# Altium PCB uni project 1.PcbDoc
Units mm, origin at the board's own origin, x right, y up, seen from the top; angles counter-clockwise.
Board outline 34.42 x 13.97 mm, 2 copper layers (Top Layer, Bottom Layer), stack 1.661 mm thick; 9 components, 8 nets, 25 pads, 2 vias.
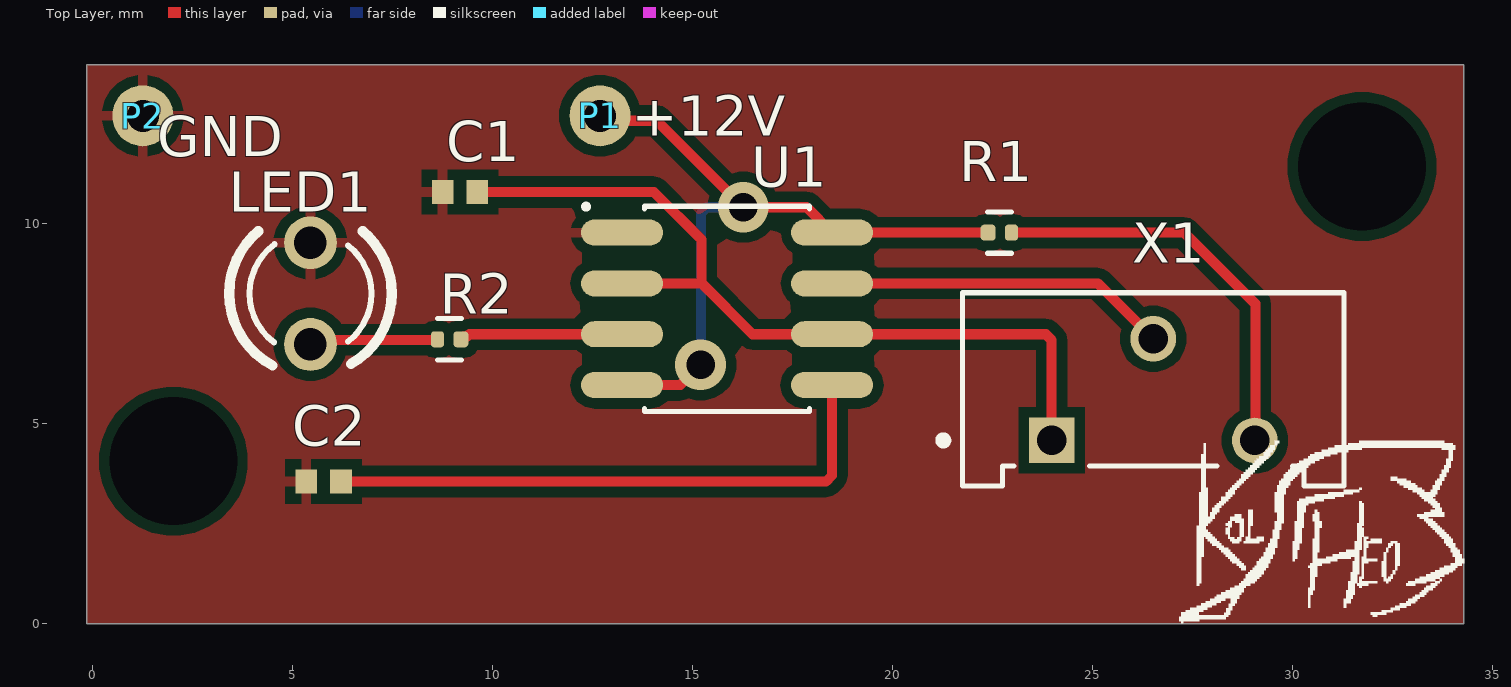
[diagram p0: Top Layer view]
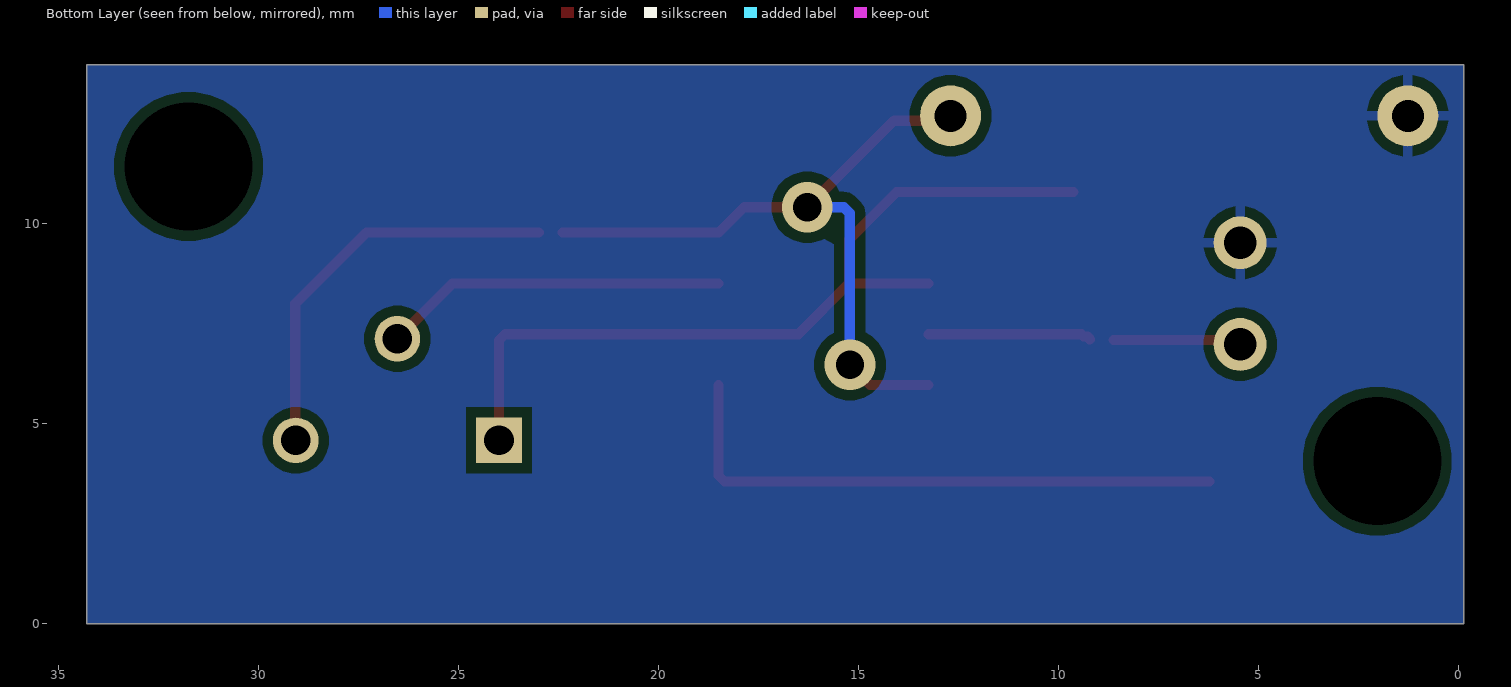
[diagram p1: Bottom Layer view, seen from below]
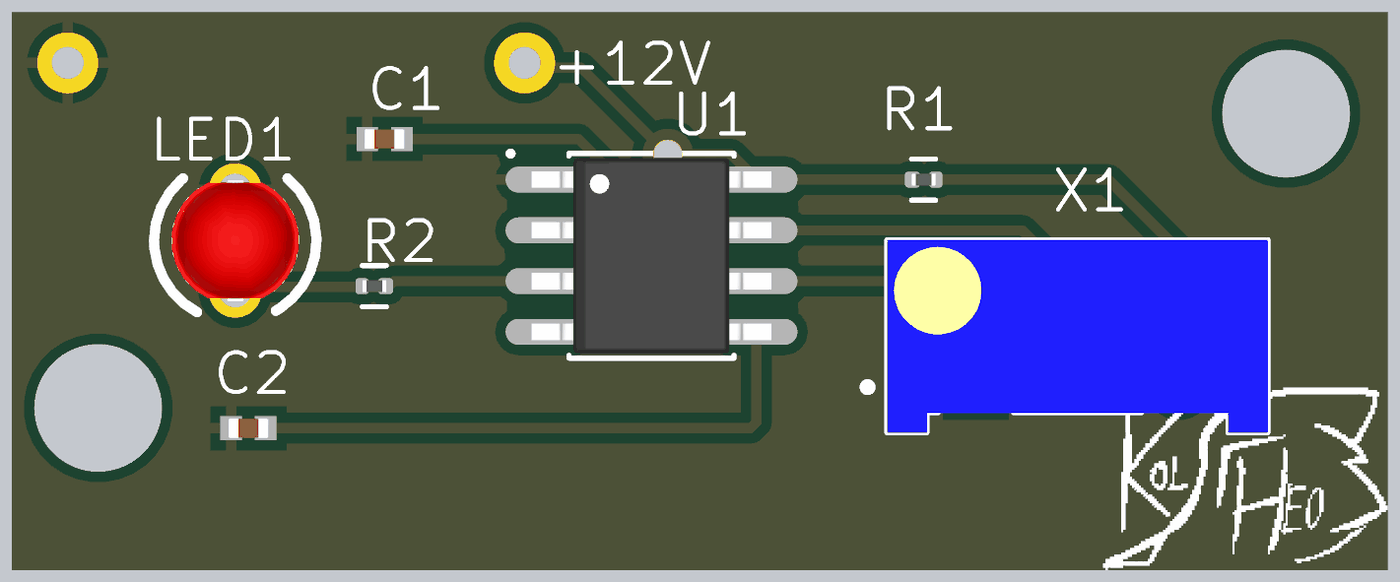
[diagram p2: 3D render of the assembled board from above, using the file's embedded part models]

## Layer stack, top to bottom
Top Solder: solder mask 0.0102, Solder Resist, Dk 3.5
Top Layer: signal copper 0.0356
Dielectric 1: dielectric 1.59, FR-4, Dk 4.8
Bottom Layer: signal copper 0.0356
Bottom Solder: solder mask 0.0102, Solder Resist, Dk 3.5

## Board outline
-0.127,0 -0.127,13.97 34.29,13.97 34.29,0

## Design rules (kind name [scope] priority, off if disabled: settings)
Clearance [All] p1: gap=0.254 ignorepadtopadclearanceinfootprint=FALSE
PolygonConnect [All] p1: connectstyle=Relief reliefconductorwidth=0.254 reliefentries=4 polygonreliefangle="90 Angle" airgapwidth=0.254
RoutingVias [All] p1: holewidth=0.711 width=1.27 viastyle="Through Hole" minholewidth=0.711 minwidth=1.27 maxholewidth=0.711 maxwidth=1.27
SolderMaskExpansion [All] p1: expansion=0 istentingtop=FALSE
SupplyNets "Schematic Supply Nets_1" [InNet('GND')] p1: voltage=0.000
SupplyNets "Schematic Supply Nets" [InNet('+12V')] p2: voltage=0.000
Width [All] p1: maxlimit=0.254 minlimit=0.254 preferedwidth=0.254
30 further rules are at their usual default settings.

## Components (designator, comment, footprint, x,y, rotation, side; value= is the part's Value field where it differs from the comment)
C1 "GJM1555C1H1R0BB01D" CAPC1005X55N 9.195,10.795 r0 top
C2 "GJM1555C1H1R0BB01D" CAPC1005X55N 5.791,3.556 r0 top
LED1 "TLLR4400" "LED3MM IR" 5.461,8.255 r90 top
P1 "+12V" Pin1 12.7,12.7 r0 top
P2 "GND" Pin1 1.27,12.7 r0 top
R1 "RC0201FR-071KL" RESC0603X26N 22.682,9.779 r180 top
R2 "RC0201FR-071KL" RESC0603X26N 8.941,7.112 r0 top
U1 "NE555DRG4" SO-8 15.875,7.874 r0 top
X1 "3296Y-1-102" TRIM_3296Y-1-102 26.53,5.855 r0 top

## Footprints (in the part's own frame and the unit in brackets; to place one, negate y for a bottom-side part, rotate by r counter-clockwise, add the part's x,y. Pads: shape width x height; smd on the part's side, far side on the other; paste and mask are expansions set on the pad)
CAPC1005X55N [mm]
  rect 0.54x0.6 smd: 1(-0.432,0) 2(0.432,0)
  body extent -0.5,-0.25 0.5,0.25, height 0.55
"LED3MM IR" [mil]
  round 52 hole 32: A(-50,0) C(50,0)
  silkscreen extent -71,-80 61,80, body extent -60,-62 60,62, height 240
Pin1 [mil]
  round 60 hole 31.5: 0(0,0)
RESC0603X26N [mm]
  rrect50% 0.33x0.4 smd: 1(-0.305,0)
  rrect50% 0.38x0.4 smd: 2(0.28,0)
  silkscreen extent -0.3,-0.52 0.3,0.52, body extent -0.3,-0.15 0.3,0.15, height 0.26
SO-8 [mm] "SOP, 8-Leads, Body 4,90x3,90mm, Pitch 1,27mm, IPC Low Density"
  oval 2.05x0.65 smd: 1(-2.625,1.905) 2(-2.625,0.635) 3(-2.625,-0.635) 4(-2.625,-1.905) 5(2.625,-1.905) 6(2.625,-0.635) 7(2.625,0.635) 8(2.625,1.905)
  silkscreen extent -3.59,-2.56 2.06,2.62, body extent -3,-2.45 3,2.45, height 1.75
TRIM_3296Y-1-102 [mm]
  rect 1.14x1.14 / inner round 1.14 / far side rect 1.14x1.14 hole 0.74: 1(-2.54,-1.27)
  round 1.14 hole 0.74: 2(0,1.27) 3(2.54,-1.27)
  silkscreen extent -5.35,-2.41 4.76,2.42, body extent -4.76,-2.41 4.76,2.41, height 11.55

## Part data
C1 C2: "0402 1 pF 50 V Â±0.1 pF Tolerance C0G SMT Multilayer Ceramic Capacitor", Package="1005 Taiyo Yuden", Check_prices=https://www.snapeda.com/parts/GJM1555C1H1R0BB01D/Murata/view-part/?ref=eda, MF=Murata, MP=GJM1555C1H1R0BB01D, SnapEDA_Link=https://www.snapeda.com/parts/GJM1555C1H1R0BB01D/Murata/view-part/?ref=snap
LED1: "Red 619nm LED Indication - Discrete 1.9V Radial", Package=None, Check_prices=https://www.snapeda.com/parts/TLLR4400/Vishay+Semiconductor+Opto+Division/view-part/?ref=eda, MF=Vishay, MP=TLLR4400, SnapEDA_Link=https://www.snapeda.com/parts/TLLR4400/Vishay+Semiconductor+Opto+Division/view-part/?ref=snap
P1 P2: library part Pin1
R1 R2: "1 kOhms Â±1% 0.05W, 1/20W Chip Resistor 0201 (0603 Metric) Moisture Resistant Thick Film", Package="0201 Yageo", Check_prices=https://www.snapeda.com/parts/RC0201FR-071KL/Yageo/view-part/?ref=eda, MF=Yageo, MP=RC0201FR-071KL, SnapEDA_Link=https://www.snapeda.com/parts/RC0201FR-071KL/Yageo/view-part/?ref=snap
U1: library part NE555, "IC OSC SGL TIMER 100KHZ 8-SOIC", Case/Package=SOIC, Frequency=100kHz, High Level Output Current=-200mA, Low Level Output Current=200mA, Max Operating Temperature=70°C, Max Supply Voltage=16V, Min Operating Temperature=0°C, Min Supply Voltage=4.5V, Nominal Supply Current=2mA, Operating Supply Current=10mA, Package Quantity=2500, Quiescent Current=15mA, Height=1.58mm, Lead Free="Lead Free", Length=4.9mm, Mount="Surface Mount", Number of Pins=8, Number of Timers/Counters=1, Packaging="Tape and Reel", Radiation Hardening=No, RoHS Compliant=Yes, Series=-, Supply Current=2mA, Weight=0.002561oz, Width=3.91mm
X1: Package=None, Availability=Unavailable, MP=3296Y-1-102, Price=None

## Free pads (board coordinates)
  round 0 hole 3.2 unplated: 1(2.032,4.064) 1(31.75,11.43)

## Via types
v1: diameter 1.27, hole 0.711, Top Layer to Bottom Layer, tented both sides, 2 vias

## Nets (pads, with @x,y where several pads share a name; then routed paths per layer and width w, separated by ;. In a path a pad name is that pad's centre, name@x,y a point inside that pad or via, vN(x,y) a via of type N, cw(c..) or ccw(c..) an arc to the next point about the centre after c; other vN are vias at no path point)
+12V: P1.0 R1.2 U1.4 U1.8 | length 18
  Top Layer w0.254: P1.0 12.823,12.577 14.118,12.577 v1(16.281,10.414) 17.865,10.414 U1.8 R1.2 ; U1.4 14.707,5.969 v1(15.215,6.477)
  Bottom Layer w0.254: v1@15.22,6.483 15.22,10.265 15.369,10.414 v1(16.281,10.414)
GND: C1.1 C2.1 LED1.C P2.0 U1.1
NetC1_2: C1.2 U1.2 U1.6 X1.1 | length 21
  Top Layer w0.254: C1.2 14.046,10.795 15.24,9.601 15.24,8.509 ; U1.2 15.24,8.509 ; X1.1 23.99,7.09 23.841,7.239 U1.6 16.51,7.239 15.24,8.509
NetC2_2: C2.2 U1.5 | length 14.6
  Top Layer w0.254: C2.2 18.351,3.556 18.5,3.705 U1.5
NetLED1_A: LED1.A R2.1 | length 3.2
  Top Layer w0.254: LED1.A@5.477,6.969 5.604,7.096 R2.1@8.62,7.096
NetR1_1: R1.1 X1.3 | length 10.3
  Top Layer w0.254: R1.1 27.305,9.779 29.083,8.001 X1.3@29.083,4.572
NetR2_2: R2.2 U1.3 | length 4.1
  Top Layer w0.254: R2.2 9.221,7.122 9.284,7.185 9.379,7.185 9.433,7.239 U1.3
NetU1_7: U1.7 X1.2 | length 8.6
  Top Layer w0.254: U1.7 25.146,8.509 X1.2@26.543,7.112

## Polygon pours and split planes (outlines as drawn)
GND on Top Layer "GND_L01_P000" (solid, pour order 0): -0.127,0 -0.127,13.97 34.29,13.97 34.29,0
GND on Bottom Layer "GND_L02_P001" (solid, pour order 1): -0.127,0 -0.127,13.97 34.29,13.97 34.29,0

## Silkscreen, mask and mechanical layers (free items; w line width, h text height)
Top Overlay:
  drawing of 15 lines, arcs and shapes, not listed
Mechanical 1:
  the board outline again, w0.254